# Altium PCB Control_Board-v1.0.PcbDoc (part 1 of 3)
Units mil, origin at the board's own origin, x right, y up, seen from the top; angles counter-clockwise.
Board outline 6234.87 x 2703.42 mil, 2 copper layers (Top Layer, Bottom Layer), stack 57 mil thick; 64 components, 54 nets, 227 pads, 139 vias.
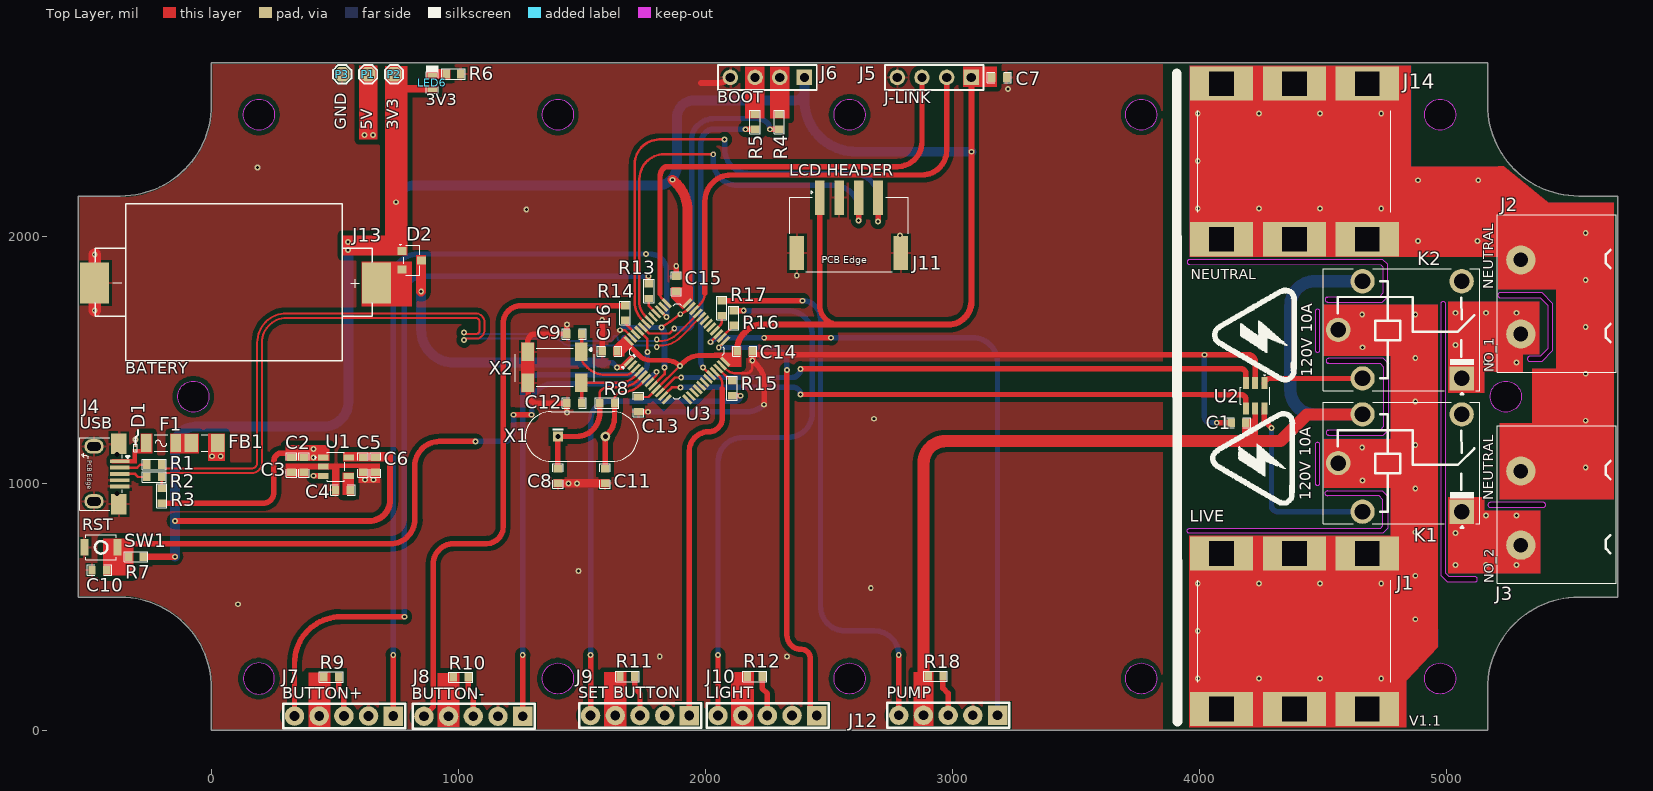
[diagram p0: Top Layer view]
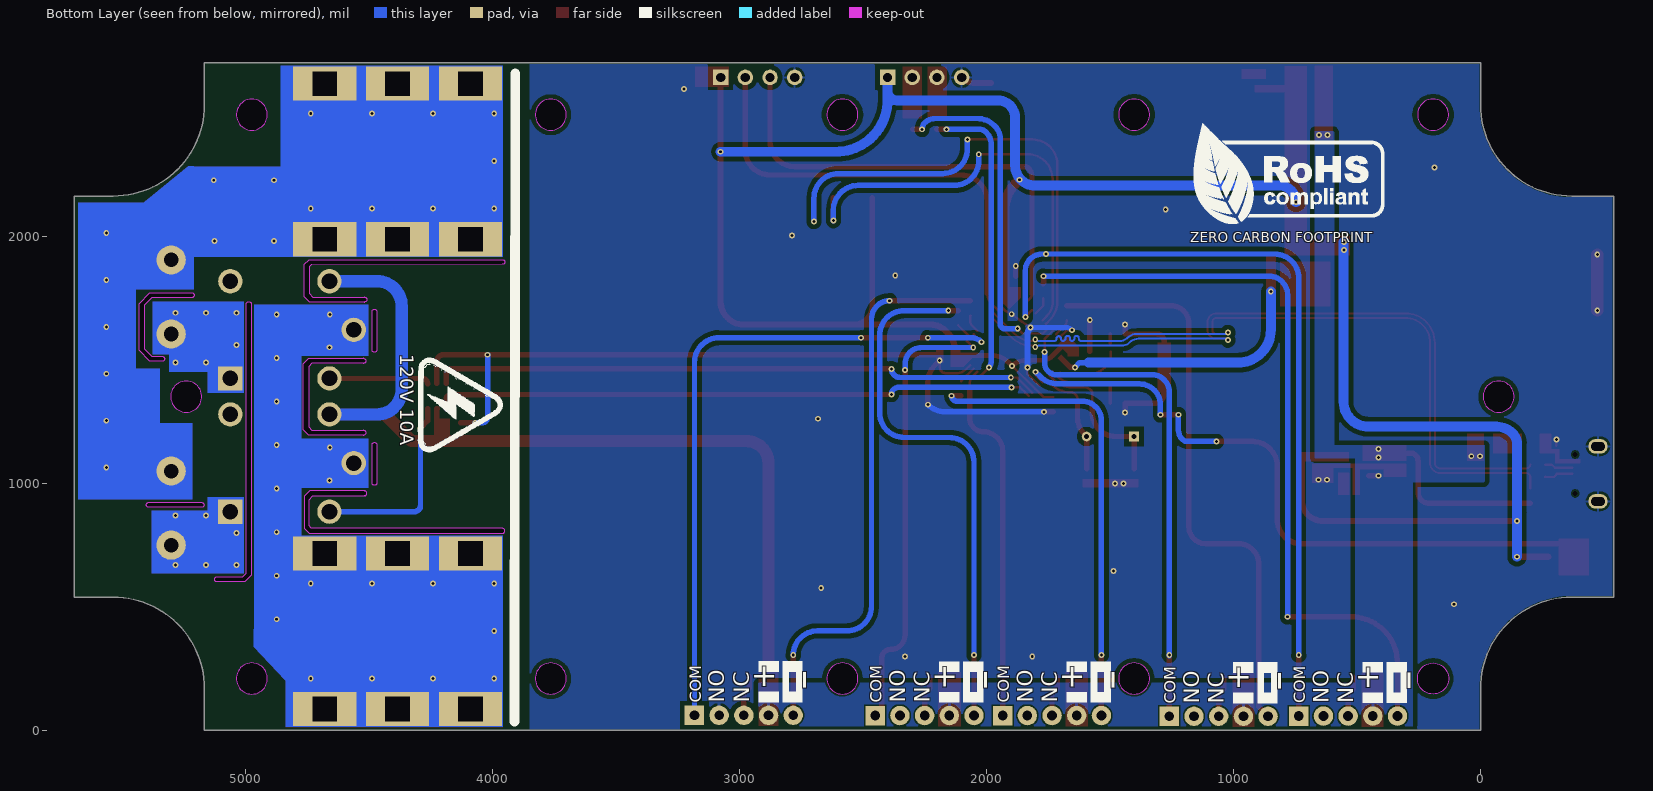
[diagram p1: Bottom Layer view, seen from below]
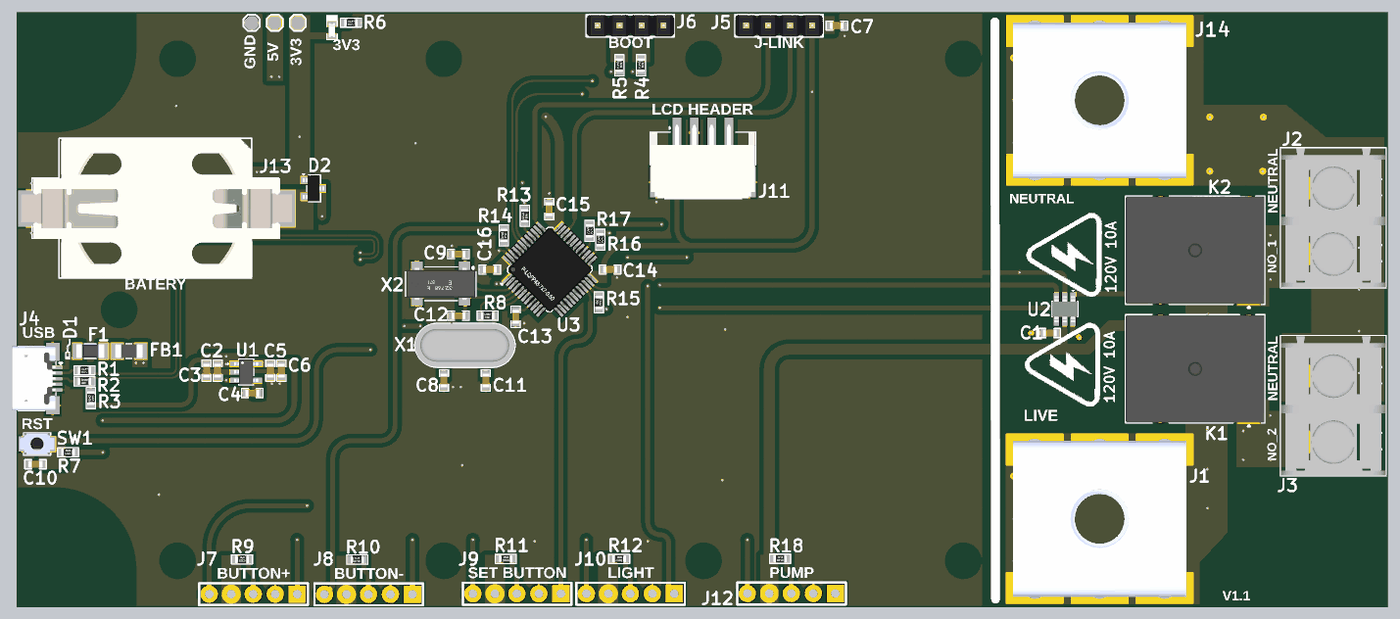
[diagram p3: 3D render of the assembled board from above, using the file's embedded part models]

## Layer stack, top to bottom
Top Solder: solder mask 3, Solder Resist, Dk 3.5
Top Layer: signal copper 10
Dielectric 1: core 37, FR-4, Dk 4.8
Bottom Layer: signal copper 10
Bottom Solder: solder mask 3, Solder Resist, Dk 3.5

## Board outline
0,0 0,170.61 ccw(c-368.76,170.61) -368.76,539.37 -539.37,539.37 -539.37,2164.05 -368.76,2164.05 ccw(c-368.76,2532.81) 0,2532.81 0,2703.42 5167.99,2703.42 5167.99,2532.81 ccw(c5536.75,2532.81) 5536.75,2164.05 5695.5,2164.05 5695.5,539.37 5536.75,539.37 ccw(c5536.75,170.61) 5167.99,170.61 5167.99,0
cut-out: 4513.66,1205.71 ccw(c4523.63,1205.71) 4523.63,1195.74 4523,1195.72 4745.85,1195.72 4767,1216.87 4767,1485 4765,1487 4767,1485.13 4745.85,1506.28 4523,1506.28 4523.63,1506.26 ccw(c4523.63,1496.29) 4513.66,1496.29 4513.66,1496.26 ccw(c4523.63,1496.26) 4523.63,1486.29 4523,1486.13 4733,1486.13 4746,1473.13 4746,1228.87 4733,1215.87 4523,1215.87 4523.63,1215.71 ccw(c4523.63,1205.74)
cut-out: 4509.66,1744.71 ccw(c4519.63,1744.71) 4519.63,1734.74 4519,1734.72 4741.85,1734.72 4763,1755.87 4763,1886.87 4744,1905.87 3960.63,1906.71 ccw(c3960.63,1896.74) 3950.66,1896.74 3950.66,1896.71 ccw(c3960.63,1896.71) 3960.63,1886.74 4735,1885.87 4744,1876.87 4744,1769.87 4729,1754.87 4519,1754.87 4519.63,1754.71 ccw(c4519.63,1744.74)
cut-out: 3950.66,808.01 cw(c3960.63,808.01) 3960.63,817.98 4735,818.85 4744,827.85 4744,934.85 4729,949.85 4519,949.85 4519.63,950.02 cw(c4519.63,959.99) 4509.66,959.99 4509.66,960.01 cw(c4519.63,960.01) 4519.63,969.98 4518.15,970 4741.85,970 4763,948.85 4763,817.85 4744,798.85 3960.63,798.02 cw(c3960.63,807.99)
cut-out: 4469,1541.37 ccw(c4479,1541.37) 4479,1531.37 ccw(c4479,1541.37) 4489,1541.37 4489,1695.42 ccw(c4479,1695.42) 4479,1705.42 ccw(c4479,1695.42) 4469,1695.42
cut-out: 4469,1002 ccw(c4479,1002) 4479,992 ccw(c4479,1002) 4489,1002 4489,1156.05 ccw(c4479,1156.05) 4479,1166.05 ccw(c4479,1156.05) 4469,1156.05
cut-out: 4978,628.81 5004.96,601.85 5116.82,601.85 ccw(c5116.82,611.85) 5126.82,611.85 ccw(c5116.82,611.85) 5116.82,621.85 5011.92,621.85 4998,635.77 4998,1726.5 ccw(c4988,1726.5) 4988,1736.5 ccw(c4988,1726.5) 4978,1726.5
cut-out: 5179,902.96 5393.03,903.4 ccw(c5393.03,913.4) 5403.03,913.4 ccw(c5393.03,913.4) 5393.03,923.4 5179,922.96 ccw(c5179,912.96) 5169,912.96 ccw(c5179,912.96)
cut-out: 5329.04,1504.7 ccw(c5339.04,1504.7) 5339.04,1494.7 5388.24,1494.7 5432.04,1538.5 5432.04,1728.66 5388.24,1772.46 5219.04,1772.46 ccw(c5219.04,1762.46) 5209.04,1762.46 ccw(c5219.04,1762.46) 5219.04,1752.46 5380.7,1752.46 5412.04,1721.12 5412.04,1546.03 5380.7,1514.7 5339.04,1514.7 ccw(c5339.04,1504.7)
cut-out: 5241.48,1288.72 cw(c5241.48,1351.71) 5241.48,1414.7 cw(c5241.48,1351.71)
cut-out: 192.26,2430.45 cw(c192.26,2493.44) 192.26,2556.44 cw(c192.26,2493.44)
cut-out: 1402.89,2430.45 cw(c1402.89,2493.44) 1402.89,2556.44 cw(c1402.89,2493.44)
cut-out: 2583.99,2430.45 cw(c2583.99,2493.44) 2583.99,2556.44 cw(c2583.99,2493.44)
cut-out: 3765.1,2430.45 cw(c3765.1,2493.44) 3765.1,2556.44 cw(c3765.1,2493.44)
cut-out: 4975.73,2430.45 cw(c4975.73,2493.44) 4975.73,2556.44 cw(c4975.73,2493.44)
cut-out: 5241.48,1288.72 cw(c5241.48,1351.71) 5241.48,1414.7 cw(c5241.48,1351.71)
cut-out: 4975.73,146.99 cw(c4975.73,209.98) 4975.73,272.97 cw(c4975.73,209.98)
cut-out: 3765.1,146.99 cw(c3765.1,209.98) 3765.1,272.97 cw(c3765.1,209.98)
cut-out: 2583.99,146.99 cw(c2583.99,209.98) 2583.99,272.97 cw(c2583.99,209.98)
cut-out: 1402.89,146.99 cw(c1402.89,209.98) 1402.89,272.97 cw(c1402.89,209.98)
cut-out: 192.26,146.99 ccw(c192.26,209.98) 192.26,272.97 ccw(c192.26,209.98)
cut-out: -73.49,1288.72 cw(c-73.49,1351.71) -73.49,1414.7 cw(c-73.49,1351.71)

## Design rules (kind name [scope] priority, off if disabled: settings)
BoardOutlineClearance [All] p1: gap=0 ignorepadtopadclearanceinfootprint=FALSE except(5: Fill-OutlineEdge Fill-CutoutEdge Poly-OutlineEdge Poly-CutoutEdge)
Clearance Clearance_USB [IsPad AND HasFootprint('U254-051T-4BH83-F1S')] p1: gap=7 ignorepadtopadclearanceinfootprint=FALSE except(0: Arc-Hole Track-Hole SMDPad-THPad SMDPad-Hole THPad-Hole Via-Hole Fill-Hole Poly-Hole Region-Hole Text-Hole)
Clearance Clearance_1 [InNamedPolygon('Top_Layer')] p2: gap=20 ignorepadtopadclearanceinfootprint=FALSE except(0: Arc-Hole Track-Hole SMDPad-Hole THPad-Hole Via-Hole Fill-Hole Poly-Hole Region-Hole Text-Hole)
Clearance [All] p3: gap=7 ignorepadtopadclearanceinfootprint=FALSE except(0: Arc-Hole Track-Hole SMDPad-Hole THPad-Hole Via-Hole Fill-Hole Poly-Hole Region-Hole Text-Hole; 4: Arc-SMDPad Track-SMDPad SMDPad-SMDPad)
DiffPairsRouting [All] p1: maxlimit=11 minlimit=11 mostfreqgap=11 toplayer_minwidth=8 toplayer_maxwidth=8 toplayer_prefwidth=8 bottomlayer_minwidth=8 bottomlayer_maxwidth=8 bottomlayer_prefwidth=8 impedanceprofiledriven=TRUE impedanceprofileid={EA49E1FB-7DB8-49F6-A60D-FD8E552CC3B2} impedanceprofilevalue=90.000000 maxuncoupledlength=500
HoleSize [All] p1: absolutevalues=TRUE maxlimit=1000 minlimit=1 maxpercent=80.000 minpercent=20.000
MatchedLengths "Schematic Matched Net Lengths" [InNetClass('USB')] p1: tolerance=50 checknetsindiffpair=TRUE checkdiffpairvsdiffpair=FALSE checkxsignals=FALSE checkothers=FALSE
MaxMinImpedance "Schematic Impedance Constraint" [InNetClass('USB')] p1: minimum=85.00 maximum=90.00
MinimumSolderMaskSliver [All] p1: minsoldermaskwidth=0
PolygonConnect [All] p1: thpad.connectstyle=Relief thpad.reliefconductorwidth=10 thpad.reliefentries=4 thpad.polygonreliefangle="90 Angle" thpad.airgapwidth=10 smdpad.connectstyle=Relief smdpad.reliefconductorwidth=10 smdpad.reliefentries=4 smdpad.polygonreliefangle="90 Angle" smdpad.airgapwidth=10 via.connectstyle=Direct via.reliefconductorwidth=10 via.reliefentries=4 via.polygonreliefangle="90 Angle" via.airgapwidth=10
RoutingVias [All] p1: holewidth=11.81 width=23.62 viastyle="Through Hole" minholewidth=11.81 minwidth=23.62 maxholewidth=11.81 maxwidth=23.62
ShortCircuit [(InNet('GND') AND InNetClass('USB'))] p1: allowed=TRUE
SilkToSilkClearance [All] p1: silktosilkclearance=0
SilkToSolderMaskClearance [IsPad] p1: minsilkscreentomaskgap=0 clearancetoexposedcopper=TRUE
SolderMaskExpansion [All] p1: expansion=4 istentingtop=FALSE
Width [All] p1: maxlimit=100 minlimit=10 preferedwidth=22 minimp=50.000000 maximp=50.000000 favimp=50.000000
24 further rules are at their usual default settings.

## Classes and differential pairs
differential pair class USB_Lines: USB_D
net class USB: USB_D_N USB_D_P
component class U_Power_Sheet: C1 C2 C3 C4 C5 C6 C7 D1 D2 F1 FB1 J1 J2 J3 J4 J5 J6 J13 J14 K1 K2 P1 P2 P3 R1 R2 R3 R4 R5 U1 U2
component class U_Controller_Sheet: C8 C9 C10 C11 C12 C13 C14 C15 C16 J7 J8 J9 J10 J11 J12 LED6 R6 R7 R8 R9 R10 R11 R12 R13 R14 R15 R16 R17 R18 SW1 U3 X1 X2
differential pair USB_D: +USB_D_P -USB_D_N

## Components (designator, comment, footprint, x,y, rotation, side; value= is the part's Value field where it differs from the comment)
C1 "0.1uF" Cap-0603 4159,1246 r0 top locked
C2 "0.1uF" Cap-0603 374.22,1075.17 r90 top locked
C3 "10uF" Cap-0603 324.22,1075.17 r90 top locked
C4 "22nF" Cap-0603 532.23,973.17 r0 top locked
C5 "0.1uF" Cap-0603 614.22,1075.17 r90 top locked
C6 "10uF" Cap-0603 664.22,1075.17 r90 top locked
C7 "0.1uF" Cap-0603 3190.23,2644.17 r180 top locked
C8 "30pF" Cap-0603 1403.23,1030.17 r90 top locked
C9 "15pF" Cap-0603 1469.23,1605.17 r0 top locked
C10 "1uF" Cap-0603 -453.77,649.17 r180 top locked
C11 "30pF" Cap-0603 1594.23,1030.17 r90 top locked
C12 "15pF" Cap-0603 1469.23,1325.17 r0 top locked
C13 "0.1uF" Cap-0603 1729.23,1320.17 r90 top locked
C14 "0.1uF" Cap-0603 2159.23,1535.17 r180 top locked
C15 "0.1uF" Cap-0603 1882.23,1809.17 r270 top
C16 "0.1uF" Cap-0603 1612.23,1535.17 r0 top locked
D1 "PESD5V0H1BSFYL" DSN0603-2 -307.6,1143.58 r90 top locked
D2 "BAT54C" SOT-23 810.6,1903.57 r270 top locked
F1 "1206L300SLTHYR" "Fuse 1206 (3216 Metric)" -204.43,1163.58 r0 top locked
FB1 "100MHz" IND-1206 -28.58,1163.58 r0 top locked
J1 "ACTB273-Cu-T2" ACTB273-CU-T2 4385.28,401.04 r0 top locked
J2 "MX7620-7.62-02P-GN01-Cu-S-A" MX7620-7.62-02P-GN01-Cu-S-A 5302.23,1605.17 r90 top locked
J3 "MX7620-7.62-02P-GN01-Cu-S-A" MX7620-7.62-02P-GN01-Cu-S-A 5302.23,750.17 r90 top locked
J4 "U254-051T-4BH83-F1S" U254-051T-4BH83-F1S -423.6,1038.58 r270 top locked
J5 "B-2100S04P-A110" HDR1X4_ 3077.23,2644.17 r180 top locked
J6 "B-2100S04P-A110" HDR1X4_ 2401.23,2644.17 r180 top locked
J7 "DNP" "5P Through Hole Pads" 536.23,58.17 r180 top locked
J8 "DNP" "5P Through Hole Pads" 1060.23,57.17 r180 top locked
J9 "DNP" "5P Through Hole Pads" 1735.23,60.17 r180 top locked
J10 "DNP" "5P Through Hole Pads" 2251.23,60.17 r180 top locked
J11 "WAFER-PH2.0-4PWB" WAFER-PH2.0-4PWB 2463.26,2157 r0 top
J12 "DNP" "5P Through Hole Pads" 2983.23,61.17 r180 top locked
J13 "CR2032-BS-6-1" CR2032-BS-6-1 97.22,1812.17 r0 top locked
J14 "ACTB273-Cu-T2" ACTB273-CU-T2 4385.28,2303.96 r180 top locked
K1 "SRA-05VDC-CL" SRA-05VDC-CL 5062.81,1425.2 r0 top locked
K2 "SRA-05VDC-CL" SRA-05VDC-CL 5062.81,885.83 r0 top locked
LED6 "RED" LED-0603 894.23,2623.64 r90 top
P1 "TEST POINT" Test-point 634.23,2657.17 r180 top locked
P2 "TEST POINT" Test-point 739.23,2657.17 r180 top locked
P3 "TEST POINT" Test-point 529.23,2657.17 r180 top locked
R1 "20R" Res-0603 -231.6,1076.58 r0 top locked
R2 "20R" Res-0603 -231.6,1026.58 r0 top locked
R3 "4.7K" Res-0603 -201.6,950 r90 top
R4 "10K" Res-0603 2299.23,2464.17 r90 top locked
R5 "10K" Res-0603 2201.23,2464.17 r90 top locked
R6 "60.4R" Res-0603 980.23,2658.17 r0 top locked
R7 "10K" Res-0603 -305.77,703.17 r180 top locked
R8 "1M" Res-0603 1602.23,1325.17 r0 top locked
R9 "10K" Res-0603 485.23,216.17 r180 top locked
R10 "10K" Res-0603 1009.23,215.17 r180 top locked
R11 "10K" Res-0603 1684.23,218.17 r180 top locked
R12 "10K" Res-0603 2200.23,218.17 r180 top locked
R13 "330R" Res-0603 1771.23,1779.17 r90 top locked
R14 "330R" Res-0603 1675.23,1690.17 r90 top locked
R15 "330R" Res-0603 2108.23,1385.17 r270 top locked
R16 "330R" Res-0603 2115.23,1670.17 r90 top locked
R17 "330R" Res-0603 2066.23,1710.17 r90 top locked
R18 "10K" Res-0603 2932.23,219.17 r180 top locked
SW1 "B3U-1000P" B3U-1000P -446.77,741.17 r180 top locked
U1 "RT9193-33GB" SOT-23-5 504.22,1068.17 r0 top locked
U2 "LK1802" SOT-23-6 4226.6,1354.57 r270 top locked
U3 "STM32F103C8T6" "48-LQFP (7x7)_" 1885.23,1535.17 r45 top locked
X1 "8Mhz" 71008000RW1 1403.11,1190.17 r0 top locked
X2 "32.768kHz" MC-306 1389.23,1470.17 r180 top locked value=32.786kHz

## Footprints (in the part's own frame and the unit in brackets; to place one, negate y for a bottom-side part, rotate by r counter-clockwise, add the part's x,y. Pads: shape width x height; smd on the part's side, far side on the other; paste and mask are expansions set on the pad)
"5P Through Hole Pads" [mm]
  rect 2x2 hole 1: 1(-5.08,0)
  round 2 hole 1: 2(-2.54,0) 3(0,0) 4(2.54,0) 5(5.08,0)
  silkscreen extent -6.3,-1.27 6.25,1.27
"48-LQFP (7x7)_" [mm]
  rect 1.22x0.32 smd: 1(-4.25,2.75) 2(-4.25,2.25) 3(-4.25,1.75) 4(-4.25,1.25) 5(-4.25,0.75) 6(-4.25,0.25) 7(-4.25,-0.25) 8(-4.25,-0.75) 9(-4.25,-1.25) 10(-4.25,-1.75) 11(-4.25,-2.25) 12(-4.25,-2.75) 25(4.25,-2.75) 26(4.25,-2.25) 27(4.25,-1.75) 28(4.25,-1.25) 29(4.25,-0.75) 30(4.25,-0.25) 31(4.25,0.25) 32(4.25,0.75) 33(4.25,1.25) 34(4.25,1.75) 35(4.25,2.25) 36(4.25,2.75)
  rect 0.32x1.22 smd: 13(-2.75,-4.25) 14(-2.25,-4.25) 15(-1.75,-4.25) 16(-1.25,-4.25) 17(-0.75,-4.25) 18(-0.25,-4.25) 19(0.25,-4.25) 20(0.75,-4.25) 21(1.25,-4.25) 22(1.75,-4.25) 23(2.25,-4.25) 24(2.75,-4.25) 37(2.75,4.25) 38(2.25,4.25) 39(1.75,4.25) 40(1.25,4.25) 41(0.75,4.25) 42(0.25,4.25) 43(-0.25,4.25) 44(-0.75,4.25) 45(-1.25,4.25) 46(-1.75,4.25) 47(-2.25,4.25) 48(-2.75,4.25)
  silkscreen extent -5.16,-3.58 3.66,3.58, body extent -4.51,-4.51 4.49,4.49, height 1.43
71008000RW1 [mm]
  rect 1x1 hole 0.5: 1(0,0)
  round 1 hole 0.5: 2(4.88,0)
  silkscreen extent -3.37,-2.57 8.25,2.57, body extent -3.34,-2.5 8.16,2.5, height 3.85
ACTB273-CU-T2 [mm]
  rect 6.5x3.5 hole 2.5 square: 1(-7.5,-8) 1(-7.5,8) 1(0,-8) 1(0,8) 1(7.5,-8) 1(7.5,8)
  silkscreen extent -9.93,-5.21 9.93,5.24, body extent -10,-9.01 10,8.99, height 20
B3U-1000P [mm] "SWITCH TACTILE SPST-NO 0.05A 12V"
  rect 0.82x1.72 smd: 1(-1.7,0) 2(1.7,0)
  silkscreen extent -1.57,-1.3 1.57,1.3, body extent -2,-1.26 2,1.24, height 1.6
Cap-0603 [mil]
  rect 30x35 smd mask+2.36: 1(-30,0) 2(30,0)
  silkscreen extent -49,-21 49,21, body extent -32,-16 31,16, height 34
CR2032-BS-6-1 [mm]
  rect 3x4.2 smd: 1(14.5,0) 2(-14.5,0)
  silkscreen extent -14.41,-8.03 14.09,8.12, body extent -15.65,-8 15.65,8, height 5.6
DSN0603-2 [mm]
  rect 0.2x0.24 smd mask+0.055: 1(-0.2,0) 2(0.2,0)
  silkscreen extent -0.38,-0.2 0.38,0.2, body extent -0.3,-0.15 0.3,0.15, height 0.32
"Fuse 1206 (3216 Metric)" [mm] "0.126\" L x 0.062\" W x 0.026\" H (3.20mm x 1.58mm x 0.65mm)"
  rect 1.06x1.82 smd: 1(-1.528,0) 2(1.528,0)
  silkscreen extent -0.68,-0.85 0.68,0.85, body extent -1.6,-0.79 1.6,0.79, height 0.85
HDR1X4_ [mm] "Connector; Header; 4 Position"
  rect 1.6x1.6 hole 0.95: 1(0,0)
  round 1.6 hole 0.95: 2(2.54,0) 3(5.08,0) 4(7.62,0)
  silkscreen extent -1.27,-1.27 8.89,1.27, body extent -1.27,-1.27 8.89,1.27, height 9.5
IND-1206 [mm]
  rect 1.4x1.82 smd: 1(-1.36,0) 2(1.36,0)
  silkscreen extent -0.34,-0.85 0.34,0.85, body extent -1.6,-0.8 1.6,0.8, height 1.3
LED-0603 [mm]
  rect 0.5x1 smd: 1(-0.75,0) 2(0.75,0)
  silkscreen extent -1.12,-0.66 1.75,0.66, body extent -0.82,-0.37 0.82,0.36, height 0.68
MC-306 [mm]
  rect 1.3x1.9 smd: 1(-2.75,-1.6) 2(2.75,-1.6) 3(2.75,1.6) 4(-2.75,1.6)
  silkscreen extent -4.06,-1.96 4.06,1.96, body extent -4,-1.9 4,1.9, height 2.54
MX7620-7.62-02P-GN01-Cu-S-A [mm]
  round 3 hole 1.5: 1(0,0) 2(7.62,0)
  silkscreen extent -3.91,-9.8 12.29,2.41, body extent -3.82,-9.76 12.22,2.34, height 12.7
Res-0603 [mil]
  rect 30x35 smd: 1(-30,0) 2(30,0)
  silkscreen extent -48,-21 48,21, body extent -31,-17 31,17, height 18
SOT-23 [mm] "TRANS NPN 40V 0.6A SOT23"
  rect 0.82x0.92 smd: 1(-0.95,-1) 2(0.95,-1) 3(0,1)
  silkscreen extent -1.68,-1.3 1.55,0.81, body extent -1.5,-1.25 1.5,1.25, height 1.05
SOT-23-5 [mm]
  rect 1.1x0.6 smd: 1(-1.3,0.95) 2(-1.3,0) 3(-1.3,-0.95) 4(1.3,-0.95) 5(1.3,0.95)
  silkscreen extent -2.13,-1.5 0.88,1.5, body extent -1.4,-1.45 1.4,1.45, height 1.45
SOT-23-6 [mm]
  rect 1.22x0.62 smd: 1(-1.31,0.95) 2(-1.31,0) 3(-1.31,-0.95) 4(1.31,-0.95) 5(1.31,0) 6(1.31,0.95)
  silkscreen extent -2.18,-1.52 0.86,1.52, body extent -1.5,-1.5 1.5,1.5, height 1.47
SRA-05VDC-CL [mm]
  rect 2.5x2.5 hole 1.6: 1(0,0)
  round 2.5 hole 1.6: 2(0,10) 3(-10.2,10) 4(-10.2,0) 5(-12.7,5)
  silkscreen extent -14.23,-1.64 1.87,11.28, body extent -14.18,-1.2 1.82,11.21, height 15.2
Test-point [mil]
  oct 60x60 smd: 1(0,0)
  silkscreen extent -37,-37 37,37
U254-051T-4BH83-F1S [mm]
  rect 0.4x2 smd paste-100 mask+0.051: 1(-1.3,1.325) 2(-0.65,1.325) 3(0,1.325) 4(0.65,1.325) 5(1.3,1.325)
  oval 1.5x2 hole 0.9 slot 1.4 at 90 deg paste+0 mask+0.051: MH1(-2.83,-1.325) MH2(2.83,-1.325)
  rect 2.1x1.6 smd paste-100 mask+0.051: MP1(-3.1,1.225) MP2(3.1,1.225)
  round 0 hole 0.5 unplated paste+0: ""(-2,1.025) ""(2,1.025)
  silkscreen extent -3.73,-2.79 3.73,2.29, body extent -3.73,-3.47 3.67,1.53, height 2.3
WAFER-PH2.0-4PWB [mm]
  rect 1x3.5 smd: 1(0,0) 2(2,0) 3(4,0) 4(6,0)
  rect 1.5x3.5 smd: MP1(-2.35,-5.7) MP2(8.35,-5.7)
  silkscreen extent -3.09,-7.63 9.09,0.71, body extent -3,-7.57 9,0.91, height 5.59

## Part data
C1 C2 C5 C7 C13 C14 C15 C16: library part CS0603KRX7R8BB104, "CS Series 0603 0.1 uF 25 V ±10% X7R Multilayer Ceramic Capacitor", Manufacturer=Yageo, Supplier Part Number=33AK6279, Category="Ceramic Capacitors", ComponentLink1Description=https://www.yageo.com/upload/media/product/productsearch/datasheet/mlcc/UPY-ST_NPOX7R_16V-to-3KV_5.pdf?src-supplier=Digi-Key, ComponentLink1URL=https://www.yageo.com/upload/media/product/productsearch/datasheet/mlcc/UPY-ST_NPOX7R_16V-to-3KV_5.pdf?src-supplier=Digi-Key, ComponentLink2Description=https://datasheet.octopart.com/CS0603KRX7R8BB104-Yageo-datasheet-158410602.pdf?src-supplier=Future+Electronics, ComponentLink2URL=https://datasheet.octopart.com/CS0603KRX7R8BB104-Yageo-datasheet-158410602.pdf?src-supplier=Future+Electronics, Manufacturer Part Number=CS0603KRX7R8BB104, Pricing="1=0.133, 25=0.092, 50=0.069, 100=0.047 (USD)", RoHS=Yes, Stock=3200, Supplier=Avnet
C3 C6: library part CL10A106MA8NRNC, "CAP CER 10UF 25V X5R 0603", Case Code (Imperial)=0603, Case Code (Metric)=1608, Dielectric=X5R, LCSC Part Number=C96446, Manufacturer=Samsung, Max Operating Temperature=85°C, Min Operating Temperature=-55°C, Package Quantity=1, Tolerance=20%, Voltage Rating=25V, Capacitance=10uF, Case/Package=0603, Category="Ceramic Capacitors", ComponentLink1Description=https://datasheet.ciiva.com/25766/cl10a106ma8nrnc-25766562.pdf?src-supplier=Digi-Key, ComponentLink1URL=https://datasheet.ciiva.com/25766/cl10a106ma8nrnc-25766562.pdf?src-supplier=Digi-Key, Construction=Flat, Contact Plating=Tin, Lead Free="Lead Free", Length=0.063inch, Manufacturer Part Number=CL10A106MA8NRNC, Mount="Surface Mount", Packaging="Tape and Reel", Pricing 1="4000=0.03753, 8000=0.03700, 16000=0.03595, 24000=0.03515, 32000=0.03383, 40000=0.03304, 400000=0.03225 (USD)", RoHS=Yes, RoHS Compliant=Yes, Series=CL, Supplier 1=Avnet, Supplier Part Number 1=CL10A106MA8NRNC, Termination=Wraparound, Thickness=0.035inch, Width=0.031inch
C4: library part FN18X223K250PSG, "25V 22nF X7R 0603 Multilayer Ceramic Capacitors MLCC - SMD/SMT ROHS", LCSC Part no=C2929161, Package=0603, ComponentLink1Description=LCSC, ComponentLink1URL=https://www.lcsc.com/product-detail/Multilayer-Ceramic-Capacitors-MLCC-SMD-SMT_PSA-Prosperity-Dielectrics-FN18X223K250PSG_C2929161.html, Item Type=Capacitor, Manfacuturer=PSA, Manufacturer Prt no=FN18X223K250PSG
C8 C11: library part CC0603JRNPO9BN300, "CAP 30pF NP0 0603 50 V ±5 % SMD", Case Code (Imperial)=0603, Case Code (Metric)=1608, Dielectric=C0G, Insulation Resistance=10GR, LCSC Part Number=C113797, Manufacturer=Yageo, Max Operating Temperature=125°C, Min Operating Temperature=-55°C, Resistor Type=Ceramic, Supplier Part Number 1=311-3357-1-ND, Tolerance=5%, Voltage Rating=50V, Capacitance=30pF, Case/Package=0603, Category="Ceramic Capacitors", ComponentLink1Description=https://datasheet.ciiva.com/26862/getdatasheetpartid-403531-26862766.pdf?src-supplier=Verical, ComponentLink1URL=https://datasheet.ciiva.com/26862/getdatasheetpartid-403531-26862766.pdf?src-supplier=Verical, ComponentLink2Description=https://datasheet.ciiva.com/13264/upy-gp-np0-16v-to-50v-8-3714-13264406.pdf?src-supplier=Mouser, ComponentLink2URL=https://datasheet.ciiva.com/13264/upy-gp-np0-16v-to-50v-8-3714-13264406.pdf?src-supplier=Mouser, ComponentLink3Description=https://datasheet.ciiva.com/7978/1132289-7978140.pdf?src-supplier=Element14, ComponentLink3URL=https://datasheet.ciiva.com/7978/1132289-7978140.pdf?src-supplier=Element14, ComponentLink4Description=https://datasheet.ciiva.com/28450/1443161-28450494.pdf?src-supplier=Element14, ComponentLink4URL=https://datasheet.ciiva.com/28450/1443161-28450494.pdf?src-supplier=Element14, Construction=Flat, Depth=0.8mm, Dissipation Factor=0.1%, Height=0.8mm, Lead Free="Lead Free", Length=1.6mm, Manufacturer Part Number=CC0603JRNPO9BN300, Mount="Surface Mount", Number of Pins=2, Packaging="Tape and Reel", Pricing 1="1=0.10000, 10=0.06800, 50=0.03700, 100=0.03020, 500=0.02160, 1000=0.01697 (USD)", Radiation Hardening=No, REACH SVHC="No SVHC", RoHS=Yes, RoHS Compliant=Yes, Series=CC, Stock 1=36700, Supplier 1=Digi-Key, Termination=SMD/SMT, Thickness=0.035inch, Voltage Rating (DC)=50V, Weight=7.1E-05oz, Width=0.031inch
C9 C12: library part CC0603JRNPO9BN150, "CAP CER 15PF 50V C0G/NPO 0603", Case Code (Imperial)=0603, Case Code (Metric)=1608, Dielectric=C0G, Dielectric Material=Ceramic, Insulation Resistance=100GR, LCSC Part Number=C107037, Manufacturer=Yageo, Max Operating Temperature=125°C, Min Operating Temperature=-55°C, Package Quantity=1, Supplier Part Number 1=4234670, Tolerance=5%, Voltage Rating=50V, Case/Package=0603, Category="Ceramic Capacitors", ComponentLink1Description=https://datasheet.ciiva.com/144/mlccorderingcode-144635.pdf?src-supplier=Digi-Key, ComponentLink1URL=https://datasheet.ciiva.com/144/mlccorderingcode-144635.pdf?src-supplier=Digi-Key, ComponentLink2Description=https://datasheet.ciiva.com/144/mlccorderingcode-144636.pdf?src-supplier=Digi-Key, ComponentLink2URL=https://datasheet.ciiva.com/144/mlccorderingcode-144636.pdf?src-supplier=Digi-Key, ComponentLink3Description=https://datasheet.ciiva.com/8033/1443161-8033721.pdf?src-supplier=Element14, ComponentLink3URL=https://datasheet.ciiva.com/8033/1443161-8033721.pdf?src-supplier=Element14, ComponentLink4Description=https://datasheet.ciiva.com/28450/1443161-28450472.pdf?src-supplier=Element14, ComponentLink4URL=https://datasheet.ciiva.com/28450/1443161-28450472.pdf?src-supplier=Element14, ComponentLink5Description=https://datasheet.ciiva.com/144/mlccorderingcode-144634.pdf?src-supplier=Digi-Key, ComponentLink5URL=https://datasheet.ciiva.com/144/mlccorderingcode-144634.pdf?src-supplier=Digi-Key, ComponentLink6Description=https://datasheet.ciiva.com/8033/1734582-8033723.pdf?src-supplier=Element14, ComponentLink6URL=https://datasheet.ciiva.com/8033/1734582-8033723.pdf?src-supplier=Element14, ComponentLink7Description=https://datasheet.ciiva.com/8033/1734582-8033722.pdf?src-supplier=Element14, ComponentLink7URL=https://datasheet.ciiva.com/8033/1734582-8033722.pdf?src-supplier=Element14, ComponentLink8Description=https://datasheet.ciiva.com/11464/upy-gp-np0-16v-to-50v-8-11464727.pdf?src-supplier=Avnet, ComponentLink8URL=https://datasheet.ciiva.com/11464/upy-gp-np0-16v-to-50v-8-11464727.pdf?src-supplier=Avnet, Depth=0.8mm, Height=0.8mm, Item Type=Capacitor, Lead Free="Lead Free", Length=1.6mm, Manufacturer Part Number=CC0603JRNPO9BN150, Mounting Technology="Surface Mount", Packaging="Tape and Reel", Pins=2, Pricing 1="4000=0.0038, 16000=0.0036, 80000=0.0034, 160000=0.0033, 500000=0.0031 (USD)", Radiation Hardening=No, Reach SVHC Compliant=No, RoHS=Yes, RoHS Compliant=Yes, Series=CC, Stock 1=832000, Supplier 1="Future Electronics", Termination=SMD/SMT, Thickness=0.035inch, Width=0.031inch
C10: library part TCC0603X5R105M250CT, "1uF 25V X5R ±20% 0603 Multilayer Ceramic Capacitors MLCC - SMD/SMT ROHS", LCSC Part no=C6266891, Manufacturer=CCTC, Item Type=Capacitor, Manufacturer Part No=TCC0603X5R105M250CT
D1: "TVS DIODE 5VWM 6.3VC DSN0603-2", LCSC Part Number=C477989, Manufacturer=Nexperia, Category="ESD and Circuit Protection ICs", ComponentLink1Description=http://www.farnell.com/datasheets/1961312.pdf?src-supplier=Farnell, ComponentLink1URL=http://www.farnell.com/datasheets/1961312.pdf?src-supplier=Farnell, ComponentLink2Description=https://assets.nexperia.com/documents/data-sheet/PESD5V0H1BSF.pdf?src-supplier=Digi-Key, ComponentLink2URL=https://assets.nexperia.com/documents/data-sheet/PESD5V0H1BSF.pdf?src-supplier=Digi-Key, ComponentLink3Description=http://www.farnell.com/datasheets/1961312.pdf?src-supplier=Newark, ComponentLink3URL=http://www.farnell.com/datasheets/1961312.pdf?src-supplier=Newark, Item Type=Diode, Manufacturer Part Number=PESD5V0H1BSFYL, Pricing 1="18000=0.06453, 36000=0.06278, 54000=0.06104, 90000=0.05930, 180000=0.05755, 900000=0.05581, 1800000=0.05406 (USD)", RoHS=Yes, RoHS Compliant=Yes, Stock 1=9000, Supplier 1=Avnet, Supplier Part Number 1=PESD5V0H1BSFYL
D2: LCSC Part no=C2762215, Manufacturer="Shandong Jingdao Microelectronics", ComponentLink1Description=LCSC, ComponentLink1URL=https://www.lcsc.com/product-detail/Schottky-Barrier-Diodes-SBD_Shandong-Jingdao-Microelectronics-BAT54C_C2762215.html, Item Type=Diode, Manufacturer Part No=BAT54C
F1: "PTC RESET FUSE 6V 3A 1206", Case Code (Imperial)=1206, Case Code (Metric)=3216, Hold Current=3A, LCSC Part Number=C207041, Manufacturer=Littelfuse, Max Current Rating=50A, Max Operating Temperature=85°C, Max Voltage Rating (DC)=6V, Min Operating Temperature=-40°C, Package Quantity=4000, Power Dissipation=800mW, Resistance=20mR, Trip Current=6A, Approvals=UL,TUV, Case/Package=1206, Category="PTC Resettable Fuses", ComponentLink1Description=https://datasheet.ciiva.com/7438/littelfuse-lorho-ptc-7438567.pdf?src-supplier=Digi-Key, ComponentLink1URL=https://datasheet.ciiva.com/7438/littelfuse-lorho-ptc-7438567.pdf?src-supplier=Digi-Key, ComponentLink2Description=https://datasheet.ciiva.com/7438/littelfuse-lorho-ptc-7438569.pdf?src-supplier=Digi-Key, ComponentLink2URL=https://datasheet.ciiva.com/7438/littelfuse-lorho-ptc-7438569.pdf?src-supplier=Digi-Key, ComponentLink3Description=https://datasheet.ciiva.com/7438/littelfuse-lorho-ptc-7438565.pdf?src-supplier=Digi-Key, ComponentLink3URL=https://datasheet.ciiva.com/7438/littelfuse-lorho-ptc-7438565.pdf?src-supplier=Digi-Key, Item Type=Fuse, Lead Free="Lead Free", Manufacturer Part Number=1206L300SLTHYR, Operating Supply Voltage=6V, Packaging="Tape and Reel", Pricing 1="4000=0.60290 (USD)", RoHS=Yes, RoHS Compliant=Yes, Series="POLY-FUSE®, LoRho™", Stock 1=4000, Supplier 1="Arrow Electronics", Supplier Part Number 1=1206L300SLTHYR, Termination=SMD/SMT, Time to Trip=4s, Voltage Rating (DC)=6V
FB1: library part BLM31PG121SN1L, "FERRITE BEAD 120 OHM 1206 1LN", Case Code (Imperial)=1206, Case Code (Metric)=3216, Current Rating=3.5A, DC Current=3A, DC Resistance (DCR)=20mR, LCSC Part Number=C85841, Manufacturer=Murata, Max Operating Temperature=125°C, Min Operating Temperature=-55°C, Package Quantity=3000, Tolerance=25%, Case/Package=1206, Category="Ferrite Beads and Chips", ComponentLink1Description=https://datasheet.ciiva.com/19460/1845419-19460234.pdf?src-supplier=Jameco, ComponentLink1URL=https://datasheet.ciiva.com/19460/1845419-19460234.pdf?src-supplier=Jameco, ComponentLink2Description=https://datasheet.ciiva.com/1012/l0132s0193blm31p-1012992.pdf?src-supplier=Digi-Key, ComponentLink2URL=https://datasheet.ciiva.com/1012/l0132s0193blm31p-1012992.pdf?src-supplier=Digi-Key, ComponentLink3Description=https://datasheet.ciiva.com/11799/0900766b811b5866-11799444.pdf?src-supplier=RSComponents, ComponentLink3URL=https://datasheet.ciiva.com/11799/0900766b811b5866-11799444.pdf?src-supplier=RSComponents, ComponentLink4Description=https://datasheet.ciiva.com/3081/l0110s0100blm31p-3081665.pdf?src-supplier=Avnet, ComponentLink4URL=https://datasheet.ciiva.com/3081/l0110s0100blm31p-3081665.pdf?src-supplier=Avnet, ComponentLink5Description=https://datasheet.ciiva.com/41449/001172383-da-01-en-drossel-1206-120r-3-2x1-60mm-3000st-41449554.pdf?src-supplier=Conrad, ComponentLink5URL=https://datasheet.ciiva.com/41449/001172383-da-01-en-drossel-1206-120r-3-2x1-60mm-3000st-41449554.pdf?src-supplier=Conrad, ComponentLink6Description=https://datasheet.ciiva.com/29348/442557-da-01-en-chip-drossel-1206-120r-3000ma-3-2x1-60mm-29348014.pdf?src-supplier=Conrad, ComponentLink6URL=https://datasheet.ciiva.com/29348/442557-da-01-en-chip-drossel-1206-120r-3000ma-3-2x1-60mm-29348014.pdf?src-supplier=Conrad, ComponentLink7Description=https://datasheet.ciiva.com/14122/apblm31p-data-e-14122856.pdf?src-supplier=Distrelec, ComponentLink7URL=https://datasheet.ciiva.com/14122/apblm31p-data-e-14122856.pdf?src-supplier=Distrelec, ComponentLink8Description=https://datasheet.ciiva.com/48436/blm31pg121sn1l-eng-tds-48436731.pdf?src-supplier=Distrelec, ComponentLink8URL=https://datasheet.ciiva.com/48436/blm31pg121sn1l-eng-tds-48436731.pdf?src-supplier=Distrelec, ComponentLink9Description=https://datasheet.ciiva.com/1012/l0110s0100blm31p-1012991.pdf?src-supplier=Digi-Key, ComponentLink9URL=https://datasheet.ciiva.com/1012/l0110s0100blm31p-1012991.pdf?src-supplier=Digi-Key, ComponentLink10Description=https://datasheet.ciiva.com/1012/l0110s0100blm31p-1012993.pdf?src-supplier=Digi-Key, ComponentLink10URL=https://datasheet.ciiva.com/1012/l0110s0100blm31p-1012993.pdf?src-supplier=Digi-Key, ComponentLink11Description=https://datasheet.ciiva.com/3081/l0110s0100blm31p-3081666.pdf?src-supplier=Avnet, ComponentLink11URL=https://datasheet.ciiva.com/3081/l0110s0100blm31p-3081666.pdf?src-supplier=Avnet, ComponentLink12Description=https://datasheet.ciiva.com/16390/l0110s0100blm31p-16390857.pdf?src-supplier=Future+Electronics, ComponentLink12URL=https://datasheet.ciiva.com/16390/l0110s0100blm31p-16390857.pdf?src-supplier=Future+Electronics, ComponentLink13Description=https://datasheet.ciiva.com/18093/getdatasheetpartid-152966-18093084.pdf?src-supplier=Verical, ComponentLink13URL=https://datasheet.ciiva.com/18093/getdatasheetpartid-152966-18093084.pdf?src-supplier=Verical, Contact Plating=Tin,Matte, Core Material=Ferrite, Depth=1.6mm, Frequency=100MHz, Height=1.1mm, Impedance=120R, Item Type="Ferrite Bead", Lead Free="Lead Free", Length=3.2mm, Manufacturer Part Number=BLM31PG121SN1L, Material=Steel,Ferrite, Max Current Rating=3.5A, Max DC Current=3A, Military Standard=Not, Number of Lines=1, Number of Pins=2, Packaging="Tape and Reel", Pricing 1="3000=0.11563, 6000=0.10938, 12000=0.10313, 18000=0.09688, 24000=0.09063, 30000=0.08438, 300000=0.07813 (USD)", Radiation Hardening=No, RoHS=Yes, RoHS Compliant=Yes, Shielding=Unshielded, Stock 1=290640, Supplier 1=Avnet, Supplier Part Number 1=BLM31PG121SN1L, Termination=SMD/SMT, Test Frequency=100MHz, Width=1.6mm
J1 J14: "7.5mm 240A 20mm M6 - PCB Welding Terminal ROHS", Manufacturer="CNNT(Shenzhen Connection Elec)", Package=Custom, ComponentLink1Description=JLCPCB, ComponentLink1URL=https://jlcpcb.com/partdetail/5781967-ACTB273_CuT2/C5154233, Item Type="PCB Welding Terminal", Manufacturer Part Number=ACTB273-Cu-T2
J2 J3: "Tin 2x1P 2 1 7.62mm -40℃~+105℃ 20A 300V Green 12~22 Straight pin Copper Alloy 2.5 Plugin,P=7.62mm Barrier Terminal Blocks ROHS", LCSC Part no=C5188497, ComponentLink1Description=LCSC, ComponentLink1URL=https://www.lcsc.com/product-detail/Barrier-Terminal-Blocks_MAX-MX7620-7-62-02P-GN01-Cu-S-A_C5188497.html, Item Type="Terminal Block", Manfacturer=Max, Manufacturer Part No=MX7620-7.62-02P-GN01-Cu-S-A
J4: "1.8A USB 2.0 1 260℃ Surface Mount 5P Female -40℃~+85℃ Gold Copper Alloy Micro-B SMD USB Connectors ROHS", LCSC Part no=C397452, Package=SMD, ComponentLink1Description=LCSC, ComponentLink1URL=https://www.lcsc.com/product-detail/USB-Connectors_XKB-Connectivity-U254-051T-4BH83-F1S_C397452.html, Item Type=USB, Manufacturer Part No=U254-051T-4BH83-F1S
J5 J6: "Straight 2.54mm Black Brass 1x4P Plugin,P=2.54mm Pin Headers ROHS", LCSC Part Number=C124378, Manufacturer=Ckmtw, ComponentLink1Description=LCSC, ComponentLink1URL=https://www.lcsc.com/product-detail/Pin-Headers_Ckmtw-Shenzhen-Cankemeng-B-2100S04P-A110_C124378.html, Item Type=Header, Manufacturer Part Number=B-2100S04P-A110
J7 J8 J9 J10 J12: library part "5P Through Hole Pads", "Wire Connecting Pads", Item Type="Through Hole Pads", Manufacturer Part Number="5P Through Hole Pads"
J11: "1x4P 1 2mm Male pin 4 -25℃~+85℃ 2A Surface Mount SMD,P=2mm Wire To Board / Wire To Wire Connector ROHS / C3029442", LCSC Part no=C3029442, ComponentLink1Description=LCSC, ComponentLink1URL=https://www.lcsc.com/product-detail/Wire-To-Board-Wire-To-Wire-Connector_XUNPU-WAFER-PH2-0-4PWB_C3029442.html, Item Type=Connector, Manuacturer=XUNPU, Manufacturer Part No=WAFER-PH2.0-4PWB
J13: "Battery base CR2032 SMD Battery Connectors ROHS", LCSC Part no=C70377, Manufacturer=Q&J, ComponentLink1Description=LCSC, ComponentLink1URL=https://www.lcsc.com/product-detail/Battery-Connectors_Q-J-CR2032-BS-6-1_C70377.html, Item Type=Connector, Manufacturer Part No=CR2032-BS-6-1
K1 K2: "5V 10A 20A@14VAC SPDT (1 Form C) 5 Plugin,12.4x16mm Power Relays ROHS", LCSC Part Number=C99666, Manufacturer="Ningbo Songle Relay", Package=Plugin,12.4x16mm, ComponentLink1Description=LCSC, ComponentLink1URL=https://www.lcsc.com/product-detail/Power-Relays_Ningbo-Songle-span-style-background-color-ff0-Relay-span-SRA-05VDC-CL_C99666.html, Item Type=Relay, Manufacturer Part Number=SRA-05VDC-CL
LED6: library part XL-1608SURC-06, "Colorless transparence -30℃~+85℃ Positive post 617nm~621nm Red 120° 55mW 0603 Light Emitting Diodes (LED) ROHS", LCSC Part no=C965799, Manufacturer=XINGLIGHT, Package=0603, ComponentLink1Description=LCSC, ComponentLink1URL=https://www.lcsc.com/product-detail/Light-Emitting-Diodes-LED_XINGLIGHT-XL-1608SURC-06_C965799.html, Item Type=LED, Manufacturer Part No=XL-1608SURC-06
P1 P2 P3: "Test Point ON", Item Type="TEST POINT"
R1 R2: library part 0603WAF200JT5E, "100mW Thick Film Resistors ±100ppm/℃ ±1% 20Ω 0603 Chip Resistor - Surface Mount ROHS", LCSC Part no=C22950, Manufacturer="UNI-ROYAL(Uniroyal Elec)", Package=0603, ComponentLink1Description=LCSC, ComponentLink1URL=https://www.lcsc.com/product-detail/Chip-Resistor-Surface-Mount_UNI-ROYAL-Uniroyal-Elec-0603WAF200JT5E_C22950.html, Item Type=Resistor, Manufacturer Part No=0603WAF200JT5E
R3: library part RC0603JR-074K7L, "RES SMD 4.7K OHM 5% 1/10W 0603", Case Code (Imperial)=0603, Case Code (Metric)=1608, LCSC Part Number=C105428, Manufacturer=Yageo, Max Operating Temperature=155°C, Min Operating Temperature=-55°C, Power Rating=100mW, Resistance=4.7kR, Supplier Part Number 1=311-4.7KGRCT-ND, Temperature Coefficient=100ppm/°C, Tolerance=5%, Voltage Rating=50V, Case/Package=0603, ComponentLink1Description=http://www.farnell.com/datasheets/443971.pdf?src-supplier=Element14, ComponentLink1URL=http://www.farnell.com/datasheets/443971.pdf?src-supplier=Element14, Composition="Thick Film", Depth=0.8mm, Item Type=Resistor, Lead Free="Lead Free", Length=1.6mm, Manufacturer Part Number=RC0603JR-074K7L, Military Standard=Not, Number of Pins=2, Packaging="Tape and Reel", Pricing 1="1=0.1, 10=0.02, 100=0.0081, 1000=0.00362, 2500=0.00314 (USD)", REACH SVHC="No SVHC", Stock 1=19706643, Supplier 1=Digi-Key, Termination=SMD/SMT, Voltage Rating (DC)=50V, Width=0.8mm
R4 R5 R7 R9 R10 R11 R12 R18: library part RC0603FR-0710KL, "RES SMD 10K Ohm 1% 1/10W 0603", Case Code (Imperial)=0603, Case Code (Metric)=1608, LCSC Part Number=C98220, Manufacturer=Yageo, Max Operating Temperature=155°C, Max Power Dissipation=100mW, Min Operating Temperature=-55°C, Resistance=10kR, Resistance Tolerance=1%, Resistor Type="Thick Film", Supplier Part Number 1=311-10.0KHRCT-ND, Temperature Coefficient=100ppm/°C, Voltage Rating=75V, Voltage Rating (DC)=50V, Case/Package=0603, Category="Chip SMD Resistors", ComponentLink1Description=https://datasheet.ciiva.com/7660/38590-7660789.pdf?src-supplier=Element14, ComponentLink1URL=https://datasheet.ciiva.com/7660/38590-7660789.pdf?src-supplier=Element14, ComponentLink2Description=https://datasheet.ciiva.com/7983/443971-7983596.pdf?src-supplier=Element14, ComponentLink2URL=https://datasheet.ciiva.com/7983/443971-7983596.pdf?src-supplier=Element14, ComponentLink3Description=https://datasheet.ciiva.com/22747/443971-22747519.pdf?src-supplier=Element14, ComponentLink3URL=https://datasheet.ciiva.com/22747/443971-22747519.pdf?src-supplier=Element14, ComponentLink4Description=https://datasheet.ciiva.com/46440/1868787-46440891.pdf?src-supplier=Element14, ComponentLink4URL=https://datasheet.ciiva.com/46440/1868787-46440891.pdf?src-supplier=Element14, ComponentLink5Description=https://datasheet.ciiva.com/7746/1738695-7746239.pdf?src-supplier=Element14, ComponentLink5URL=https://datasheet.ciiva.com/7746/1738695-7746239.pdf?src-supplier=Element14, ComponentLink6Description=https://datasheet.ciiva.com/15189/getdatasheetpartid-409289-15189591.pdf?src-supplier=Verical, ComponentLink6URL=https://datasheet.ciiva.com/15189/getdatasheetpartid-409289-15189591.pdf?src-supplier=Verical, Construction=Rectangular, Depth=0.8mm, Features="Moisture Resistant", Height=0.45mm, Item Type=Resistor, Lead Free="Lead Free", Lead Pitch=0.3mm, Length=1.6mm, Manufacturer Part Number=RC0603FR-0710KL, Military Standard=Not, Number of Pins=2, Number of Terminations=2, Packaging="Tape and Reel", Power Rating=100mW, Pricing 1="1=0.10000, 10=0.02400, 100=0.00970, 1000=0.00436, 2500=0.00378 (USD)", REACH SVHC=Unknown, RoHS=Yes, RoHS Compliant=Yes, Series=RC, Size Code=0603, Stock 1=25249139, Supplier 1=Digi-Key, Termination=SMD/SMT, Tolerance=1%, Weight=7.1E-05oz, Width=0.8mm
R6: library part RTT0360R4FTP, "100mW Thick Film Resistors ±100ppm/℃ ±1% 60.4Ω 0603 Chip Resistor - Surface Mount ROHS", LCSC Part no=C103744, Package=0603, ComponentLink1Description=LCSC, ComponentLink1URL=https://www.lcsc.com/product-detail/Chip-Resistor-Surface-Mount_RALEC-RTT0360R4FTP_C103744.html, Manuacturer=RALEC, Manufacturer Part No=RTT0360R4FTP
R8: library part 0603WAF1004T5E, "100mW Thick Film Resistors ±100ppm/℃ ±1% 1MΩ 0603 Chip Resistor - Surface Mount ROHS", LCSC Part no=C22935, Manufacturer="UNI-ROYAL(Uniroyal Elec)", Package=0603, Item Type=Resistor, Manfacturer Part No=0603WAF1004T5E
R13 R14 R15 R16 R17: library part RC0603JR-07330RL_1, "RES  SMD 330R 100 mW 0603", Case Code (Imperial)=0603, Case Code (Metric)=1608, LCSC Part Number=C105879, Manufacturer=Yageo, Manufacturer Part Number=RC0603JR-07330RL, Max Operating Temperature=155°C, Max Power Dissipation=100mW, Min Operating Temperature=-55°C, Package Quantity=5000, Resistance Tolerance=5%, Resistor Type="Thick Film", Supplier Part Number 1=311-330GRCT-ND, Temperature Coefficient=100ppm/°C, Voltage Rating=50V, Case/Package=0603, Category="Chip SMD Resistors", Construction=Rectangular, Depth=0.8mm, Features="Moisture Resistant", Height=0.45mm, Item Type=Resistor, Lead Free="Lead Free", Length=1.6mm, Military Standard=Not, Number of Pins=2, Number of Terminations=2, Packaging="Tape and Reel", Power Rating=100mW, Pricing 1="1=0.10000, 10=0.02000, 100=0.00800, 1000=0.00360, 2500=0.00312 (USD)", REACH SVHC="No SVHC", Resistance=330R, RoHS=Yes, RoHS Compliant=Yes, Series=RC, Size Code=0603, Stock 1=1074593, Supplier 1=Digi-Key, Termination=SMD/SMT, Tolerance=5%, Voltage Rating (DC)=50V, Width=0.8mm
SW1: "SWITCH TACTILE SPST-NO 0.05A 12V", Contact Current Rating=50mA, Contact Resistance=100mR, Insulation Resistance=100MR, LCSC Part Number=C231329, Manufacturer=Omron, Max Operating Temperature=70°C, Max Voltage Rating (DC)=12V, Min Operating Temperature=-25°C, Operating Force=1.5N, Package Quantity=1, Ratings="Dust Proof,IP40", Supplier Part Number 1=SW1020DKR-ND, Actuator Length=0.4mm, Actuator Type=Standard, ComponentLink1Description=http://www.farnell.com/datasheets/60838.pdf?src-supplier=Farnell, ComponentLink1URL=http://www.farnell.com/datasheets/60838.pdf?src-supplier=Farnell, ComponentLink2Description=http://www.farnell.com/datasheets/60838.pdf?src-supplier=Element14, ComponentLink2URL=http://www.farnell.com/datasheets/60838.pdf?src-supplier=Element14, ComponentLink3Description=https://omronfs.omron.com/en_US/ecb/products/pdf/en-b3u.pdf?src-supplier=Digi-Key, ComponentLink3URL=https://omronfs.omron.com/en_US/ecb/products/pdf/en-b3u.pdf?src-supplier=Digi-Key, ComponentLink4Description=http://www.omron.com/ecb/products/pdf/en-b3u.pdf?src-supplier=Digi-Key, ComponentLink4URL=http://www.omron.com/ecb/products/pdf/en-b3u.pdf?src-supplier=Digi-Key, ComponentLink5Description=https://www.distrelec.biz/Web/Downloads/he/et/B3U_eng_datasheet.pdf?mime=application%2Fpdf&src-supplier=Distrelec, ComponentLink5URL=https://www.distrelec.biz/Web/Downloads/he/et/B3U_eng_datasheet.pdf?mime=application%2Fpdf&src-supplier=Distrelec, ComponentLink6Description=http://www.onlinecomponents.com/productFiles/mf-OM/en-b3u.pdf?src-supplier=Onlinecomponents.com, ComponentLink6URL=http://www.onlinecomponents.com/productFiles/mf-OM/en-b3u.pdf?src-supplier=Onlinecomponents.com, ComponentLink7Description=https://www.verical.com/server-webapp/html/getDatasheet?partID=552554&src-supplier=Verical, ComponentLink7URL=https://www.verical.com/server-webapp/html/getDatasheet?partID=552554&src-supplier=Verical, ComponentLink8Description=http://www.farnell.com/datasheets/1685550.pdf?src-supplier=Element14, ComponentLink8URL=http://www.farnell.com/datasheets/1685550.pdf?src-supplier=Element14, ComponentLink9Description=http://www.farnell.com/datasheets/2610940.pdf?src-supplier=Farnell, ComponentLink9URL=http://www.farnell.com/datasheets/2610940.pdf?src-supplier=Farnell, ComponentLink10Description=https://www.alliedelec.com/m/d/4c8a9ef82804fc3c241a13c1e298fd73.pdf?src-supplier=Allied+Electronics, ComponentLink10URL=https://www.alliedelec.com/m/d/4c8a9ef82804fc3c241a13c1e298fd73.pdf?src-supplier=Allied+Electronics, Contact Material=Silver, Current Rating=50mA, Depth=2.5mm, Electrical Life=200000Cycles, Height=1.2mm, Illumination Type=Non-Illuminated,Illuminated, Item Type=Switch, Lead Free="Lead Free", Length=4mm, Manufacturer Part Number=B3U-1000P, Max Current Rating=50mA, Mechanical Life=200000Cycles, Mount="Surface Mount", Orientation=Straight, Packaging="Tape and Reel", Pricing 1="1=1, 10=0.961, 25=0.9064, 50=0.7976, 100=0.7251, 250=0.68888, 500=0.67074, 1000=0.52571 (USD)", REACH SVHC=Unknown, Stock 1=116454, Supplier 1=Digi-Key, Switch Function=Off-Mom, Switch Travel=0.15mm, Termination=SMD/SMT, Throw Configuration=SPST, Voltage Rating (DC)=12V, Weight=0.000776oz, Width=3mm
U1: "IC REG LDO 3.3V 0.3A SOT23-5", Manufacturer=Richtek, Supplier Part Number=1028-1014-1-ND, Category="Voltage Regulators - Linear", ComponentLink1Description=https://datasheet.ciiva.com/2046/3d3futf-83fb3frfm5mtkzlte2lnbkzg3d3d3f3d-2046896.pdf?src-supplier=Digi-Key, ComponentLink1URL=https://datasheet.ciiva.com/2046/3d3futf-83fb3frfm5mtkzlte2lnbkzg3d3d3f3d-2046896.pdf?src-supplier=Digi-Key, ComponentLink2Description=https://datasheet.ciiva.com/28652/1782157-28652989.pdf?src-supplier=Element14, ComponentLink2URL=https://datasheet.ciiva.com/28652/1782157-28652989.pdf?src-supplier=Element14, Manufacturer Part Number=RT9193-33GB, Pricing="1=0.53, 10=0.454, 25=0.424, 100=0.3394, 250=0.31512, 500=0.26664, 1000=0.20604 (USD)", RoHS=Yes, Stock=7748, Supplier=Digi-Key
U2: "SOT-23-6 Darlington Transistor Arrays ROHS", LCSC Part no=C2984831, Manufacturer=LANKE, Package=SOT-23-6, ComponentLink1Description=LCSC, ComponentLink1URL=https://www.lcsc.com/product-detail/Darlington-Transistor-Arrays_LANKE-LK1802_C2984831.html, Item Type=IC, Manufaure Part no=LK1802
U3: "ARM Cortex-M3 STM32 F1 Microcontroller 32-Bit 72MHz 64kB FLASH LQFP48 STM32F103C8T6", Case/Package=LQFP, Clock Frequency=72MHz, Manufacturer=STMicroelectronics, Max Operating Temperature=85°C, Max Supply Voltage=3.6V, Min Operating Temperature=-40°C, Min Supply Voltage=2V, Nominal Supply Current=1.7uA, Package Quantity=1500, Supplier Part Number=511-STM32F103C8T6, Category=Microcontrollers, ComponentLink1Description=https://datasheet.ciiva.com/8054/1730126-8054942.pdf?src-supplier=Element14, ComponentLink1URL=https://datasheet.ciiva.com/8054/1730126-8054942.pdf?src-supplier=Element14, ComponentLink2Description=https://datasheet.ciiva.com/48687/001075658-da-01-en-mcu-64kb-mem-stm32f103c8t6-lqfp-48-stm-48687589.pdf?src-supplier=Conrad, ComponentLink2URL=https://datasheet.ciiva.com/48687/001075658-da-01-en-mcu-64kb-mem-stm32f103c8t6-lqfp-48-stm-48687589.pdf?src-supplier=Conrad, Core Architecture=ARM, Data Bus Width=32b, Height=1.4mm, Interface=I2C,SPI,USB,CAN,USART, Lead Free="Lead Free", Length=7mm, Manufacturer Part Number=STM32F103C8T6, Memory Format=FLASH, Memory Size=64KB, Number of A/D Converters=2NUMBER, Number of ADC Channels=10, Number of Channels=10NUMBER, Number of I/Os=37, Number of Timers/Counters=3, Packaging=Tray, Pins=48, Pricing="1=6.11, 10=5.53, 50=5.27, 100=4.58, 1000=3.47, 10000=3.33 (USD)", RAM Size=20KB, RoHS=Yes, RoHS Compliant=Yes, Series=STM32F103C8, Stock=27404, Supplier=Mouser, Weight=0.006349oz, Width=7mm
X1: library part 71008000RW1, "8MHz 20pF ±20ppm HC-49S Crystals ROHS", LCSC Part no=C655216, Manufacture=HD, Package=HC-49S, ComponentLink1Description=LCSC, ComponentLink1URL=https://www.lcsc.com/product-detail/Crystals_HD-71008000RW1_C655216.html, Item Type=Crystal, Manufacture Part ni=71008000RW1
X2: library part "MC-306 32.7680K-A0:ROHS", "32.768kHz 12.5pF ±20ppm MC-306 Crystals ROHS", LCSC Part no=C2650464, Manufacturer="Seiko Epson", ComponentLink1Description=LCSC, ComponentLink1URL=https://www.lcsc.com/product-detail/Crystals_Seiko-Epson-MC-306-32-7680K-A0-ROHS_C2650464.html, Item Type=Crystal, Manufacturer Part No="MC-306 32.7680K-A0:ROHS"

## Via types
v1: diameter 23.62, hole 11.81, Top Layer to Bottom Layer, tented both sides, 131 vias
v2: diameter 23.62, hole 11.81, Top Layer to Bottom Layer, 8 vias

## Nets (pads, with @x,y where several pads share a name; then routed paths per layer and width w, separated by ;. In a path a pad name is that pad's centre, name@x,y a point inside that pad or via, vN(x,y) a via of type N, cw(c..) or ccw(c..) an arc to the next point about the centre after c; other vN are vias at no path point)
3V3: C5.2 C6.2 C7.2 C13.2 C14.2 C15.2 C16.2 D2.1 J5.1 J6.1 J11.1 LED6.1 P2.1 R7.1 U1.5 U3.9 U3.24 U3.36 U3.48 | length 9715.6
  Top Layer w10: U3.48@1690.36,1576.93 1696.15,1571.14 1696.15,1569.3 1690.52,1563.67 ; C13.2@1729.23,1350.17 1769.83,1350.17 U3.9@1801.72,1382.05 1802.39,1382.05 1896.33,1476 v1(1897,1476) ; 2052.68,1519 2078.27,1493.41 U3.24@2080.11,1493.41
  Top Layer w20: 1690.52,1563.67 ccw(c1698.22,1563.67) 1692.77,1558.23 1735.5,1515.5 ; 1735.52,1515.48 ccw(c1775.33,1555.33) 1775.33,1499 1841.47,1499 cw(c1841.47,1420.47) 1859.18,1496.98 cw(c1841.47,1420.47) 1896.98,1476.02 1910.71,1489.71 cw(c1981.42,1419) 1981.42,1519 2052.68,1519 2060,1519
  Top Layer w22: J11.1@2463.26,2157 2463.26,1720.91 ccw(c2541,1720.91) 2541,1643.17
  Top Layer w25: R7.1@-275.77,703.17 v1(-147.77,703.17) ; v1(-148,848) 639.07,848 ccw(c639.07,932.17) 723.23,932.17 723.23,1107.17 ; C14.2@2128,1534 2128,1538.58 cw(c2228,1538.58) 2157.29,1609.29 2166,1618 cw(c2226.76,1557.24) 2226.76,1643.17 2541,1643.17 2983.23,1643.17 ccw(c2983.23,1737.17) 3077.23,1737.17 v1(3077.23,2343.17) J5.1@3077.23,2644.17
  Top Layer w40: v1(1866.6,2229.82) cw(c1768.01,2103.52) 1928.23,2103.52 1928.23,1760.91
  Bottom Layer w40: v1(-147.77,703.17) -147.77,880.77 -148,881 -147.77,881.23 -147.77,1160.11 cw(c-87.11,1160.11) -130,1203 cw(c-64.41,1137.41) -64.41,1230.17 454.23,1230.17 ccw(c454.23,1330.17) 554.23,1330.17 v1@554.23,1978.17 ; v1(747.23,2139) cw(c814.23,2139) 814.23,2206 930,2206 1754,2206 1803,2206 ccw(c1803,2288) 1885,2288 1885,2481.93 cw(c1954.23,2481.93) 1954.23,2551.17 2364.23,2551.17 ccw(c2364.23,2588.17) 2401.23,2588.17 ; J6.1@2401.23,2644.17 2401.23,2588.17 ; v1(3077.23,2343.17) 2610.83,2343.17 cw(c2610.83,2552.77) 2401.23,2552.77 2401.23,2588.17
  other v1: 553.23,1945 553.23,1978.17
5V: C1.2 C2.2 C3.2 FB1.2 J7.4 J8.4 J9.4 J10.4 J12.4 K1.3 K2.3 P1.1 R3.1 R9.2 R10.2 R11.2 R12.2 R18.2 U1.1 U1.3 U2.5 | length 4761.4
  Top Layer w22: R3.1@-201.6,920 -200.6,919 207,919 ccw(c207,965) 253,965 253,1092 cw(c284,1092) 284,1123 306.38,1123 cw(c306.38,1105.17) C3.2@324.22,1105.17 ; v1@414.23,1031.17 414.43,1030.97 452.84,1030.97 U1.3@453.04,1030.77 ; 4144.48,1172 4145.08,1172 ; C1.2@4189,1246 4189,1248.5 4193,1252.5 4212.51,1252.5 ; U2.5@4225.39,1301.8 U2.5@4226.6,1303 ; 4226.39,1248.5 U2.5@4226.39,1301.8
  Top Layer w50: J12.4@2883.23,61.17 2883.23,1081.23 cw(c2974,1081.23) 2974,1172 4144.48,1172 ; 4145.08,1172 4329,1172 4436.53,1279.53 K2.3@4661.23,1279.53
  Bottom Layer w50: K2.3@4661.23,1279.53 4469,1279.53 cw(c4469,1379.53) 4369,1379.53 4369,1718.9 cw(c4469,1718.9) 4469,1818.9 K1.3@4661.23,1818.9
  other v1: 413.23,1031.17 413.23,1105.17 2.23,1110.17 37.23,1110.17 413.23,1140.17 619.23,2411.17 654.23,2411.17
BOOT_0: R4.1 U3.44 | length 1400.6
  Top Layer w10: U3.44@1746.04,1632.6 1771.29,1607.36 1854.51,1607.36 1874.19,1627.04 v1(1874.36,1627.04)
  Top Layer w22: v1(2261.23,2434.17) R4.1@2299.23,2434.17
  Bottom Layer w22: v1(1874.36,1627.04) 1927.1,1627.04 ccw(c1927.1,1645.17) 1945.23,1645.17 1945.23,2395.45 cw(c2019.55,2395.45) 1967,2448 1967.71,2448.71 cw(c2038.42,2378) 2038.42,2478 2208.18,2478 cw(c2208.18,2417.12) 2251.23,2460.17 cw(c2227.09,2436.03) 2261.23,2436.03 v1(2261.23,2434.17)
BOOT_1: R5.1 U3.20 | length 1209.7
  Top Layer w10: v1(1991,1470) 2023.27,1437.73 U3.20@2024.43,1437.73
  Top Layer w22: v1(2163.23,2434.17) R5.1@2201.23,2434.17
  Bottom Layer w22: v1@1992,1470 cw(c2017.99,1495.99) 1981.23,1495.99 1981.23,2371.87 cw(c2052.13,2371.87) 2002,2422 cw(c2031.37,2392.63) 2031.37,2434.17 v1(2163.23,2434.17)
GND: C1.1 C2.1 C3.1 C4.1 C5.1 C6.1 C7.1 C8.1 C9.1 C10.2 C11.1 C12.1 C13.1 C14.1 C15.1 C16.1 D1.2 J4.4 J4.5 J4.MH1 J4.MH2 J4.MP1 J4.MP2 J5.4 J6.4 J7.2 J8.2 J9.2 J10.2 J11.2 J11.MP1 J11.MP2 J12.2 J13.2 P3.1 R6.2 SW1.2 U1.2 U2.2 U3.8 U3.23 U3.35 U3.47 X2.2 X2.3 | length 5101.8
  Top Layer w10: v1(-307.77,1178.17) -307.6,1178 D1.2@-307.6,1153.46 ; v1(1653.73,1620.67) 1674.46,1620.67 U3.47@1704.28,1590.85 ; U3.8@1787.8,1395.97 1835,1443.18 v1(1835,1470) ; v1(1822.23,1631.17) 1822.23,1631.45 1825.64,1634.86 1855.97,1654.05 ccw(c1843.23,1674.17) 1857.4,1655.03 v1(1898.57,1685.5) 1923.91,1699.13 cw(c1928.73,1690.36) U3.35@1924.03,1699.19 ; U3.35@1924.03,1699.19 U3.35@1925.2,1699.82 ; U3.35@1925.25,1699.84 1927.77,1702.37 U3.35@1940.91,1716.12 ; U3.23@2066.19,1479.49 2080.61,1465.06 ccw(c2126.23,1510.69) 2126.23,1446.17 2164.23,1446.17 ccw(c2164.23,1472.17) 2190.23,1472.17 v1(2190.23,1498.17)